# Altium PCB PCB1.PcbDoc (part 1 of 2)
Units mm, origin at the board's own origin, x right, y up, seen from the top; angles counter-clockwise.
Board outline 90 x 58.77 mm, 6 copper layers (L1, GND1, +3V3, 1.8V, GND, L6), stack 1.776 mm thick; 134 components, 89 nets, 660 pads, 134 vias.
Unrouted connection lines stored in the file: 40.
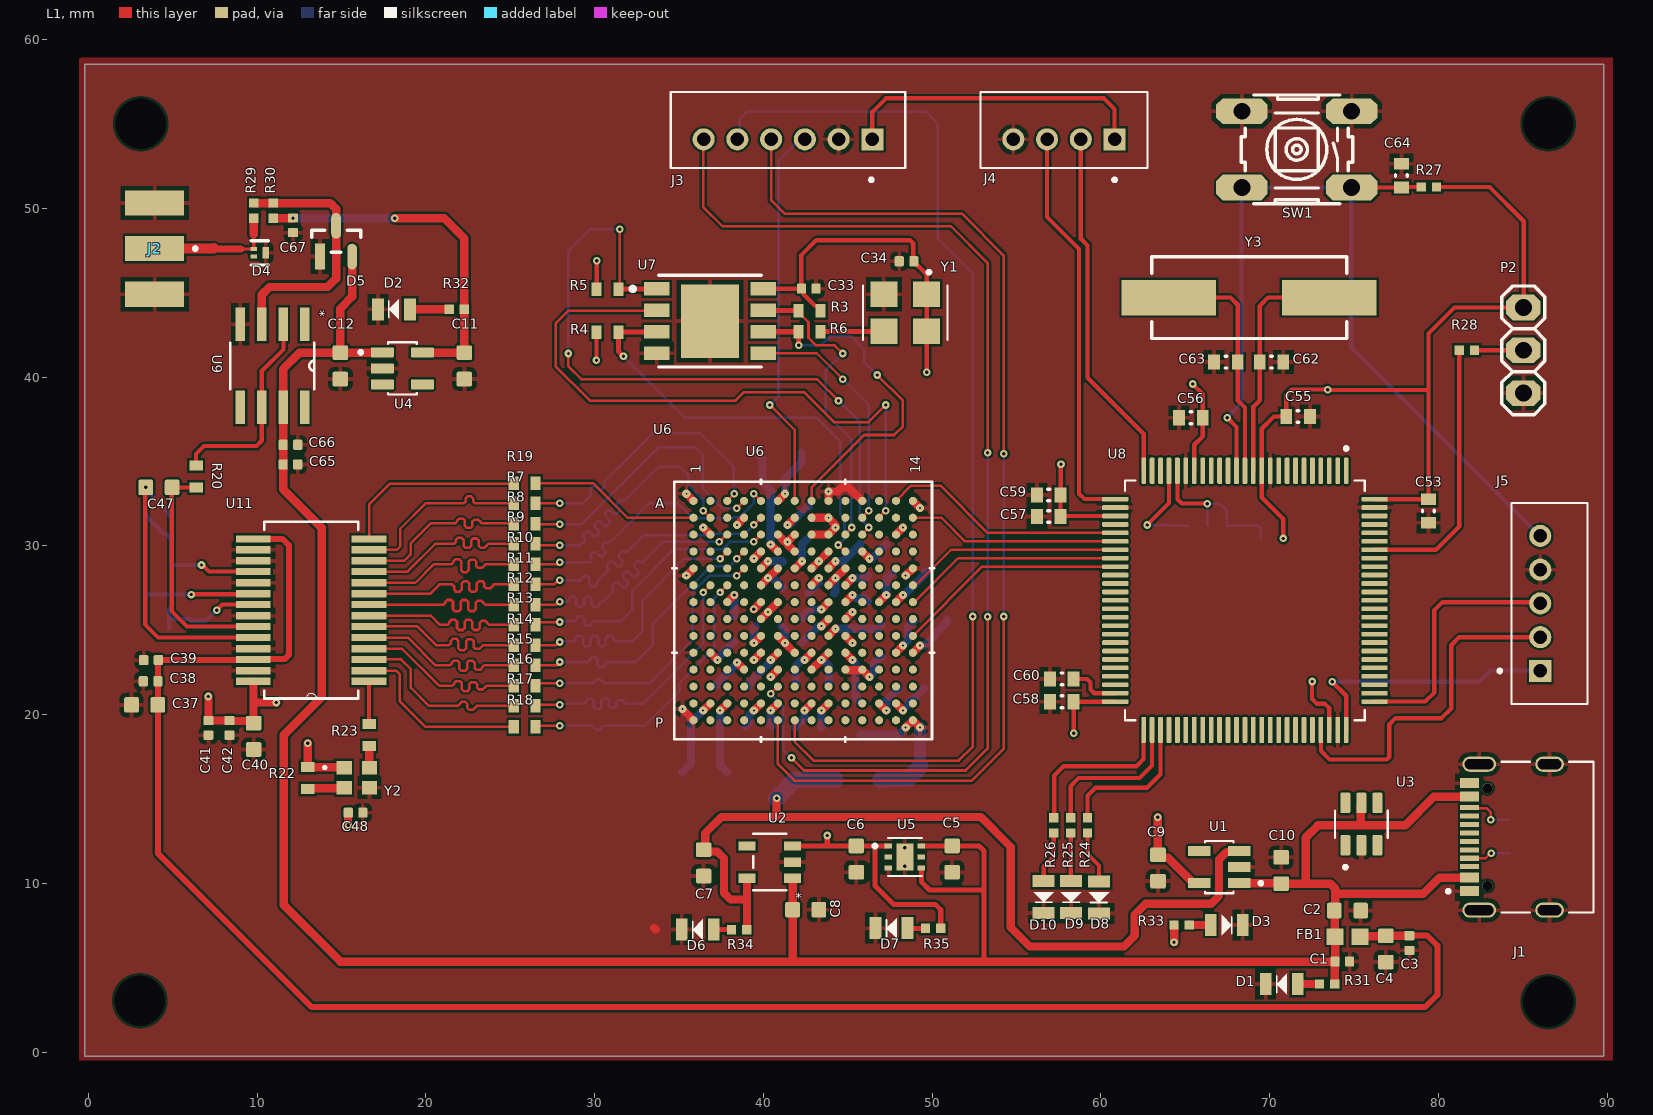
[diagram p0: L1 view]
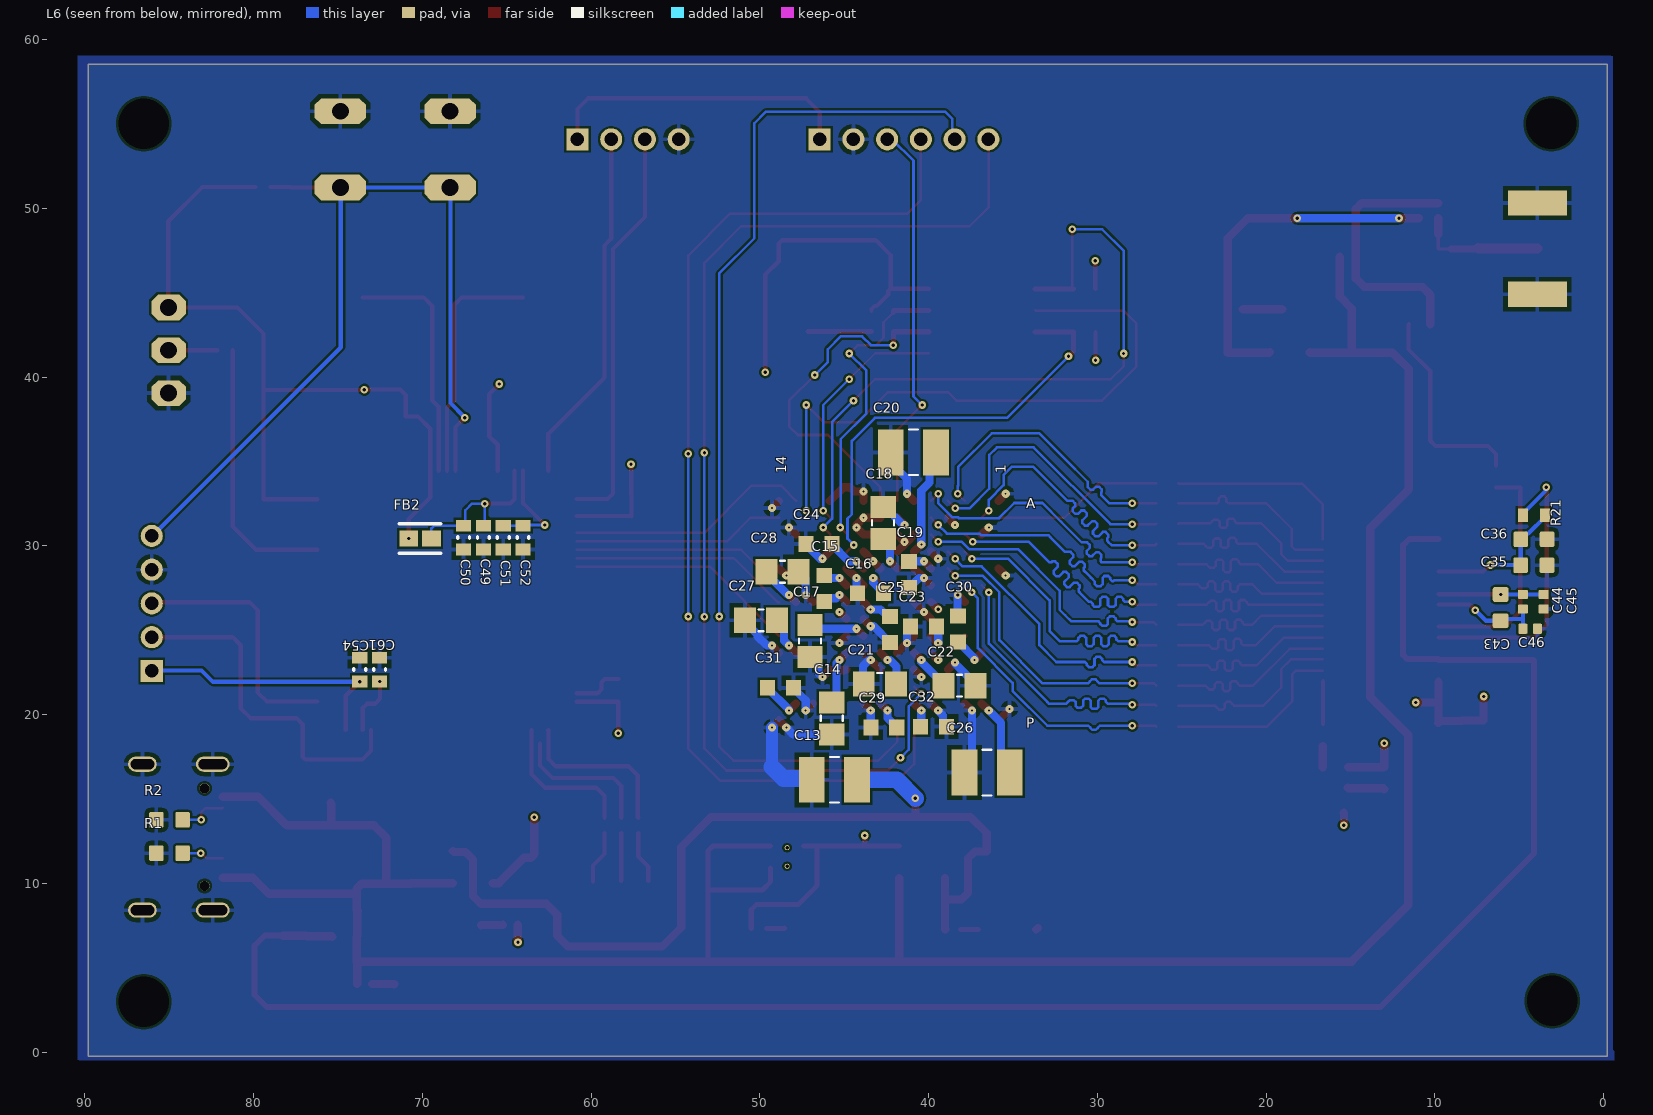
[diagram p1: L6 view, seen from below]
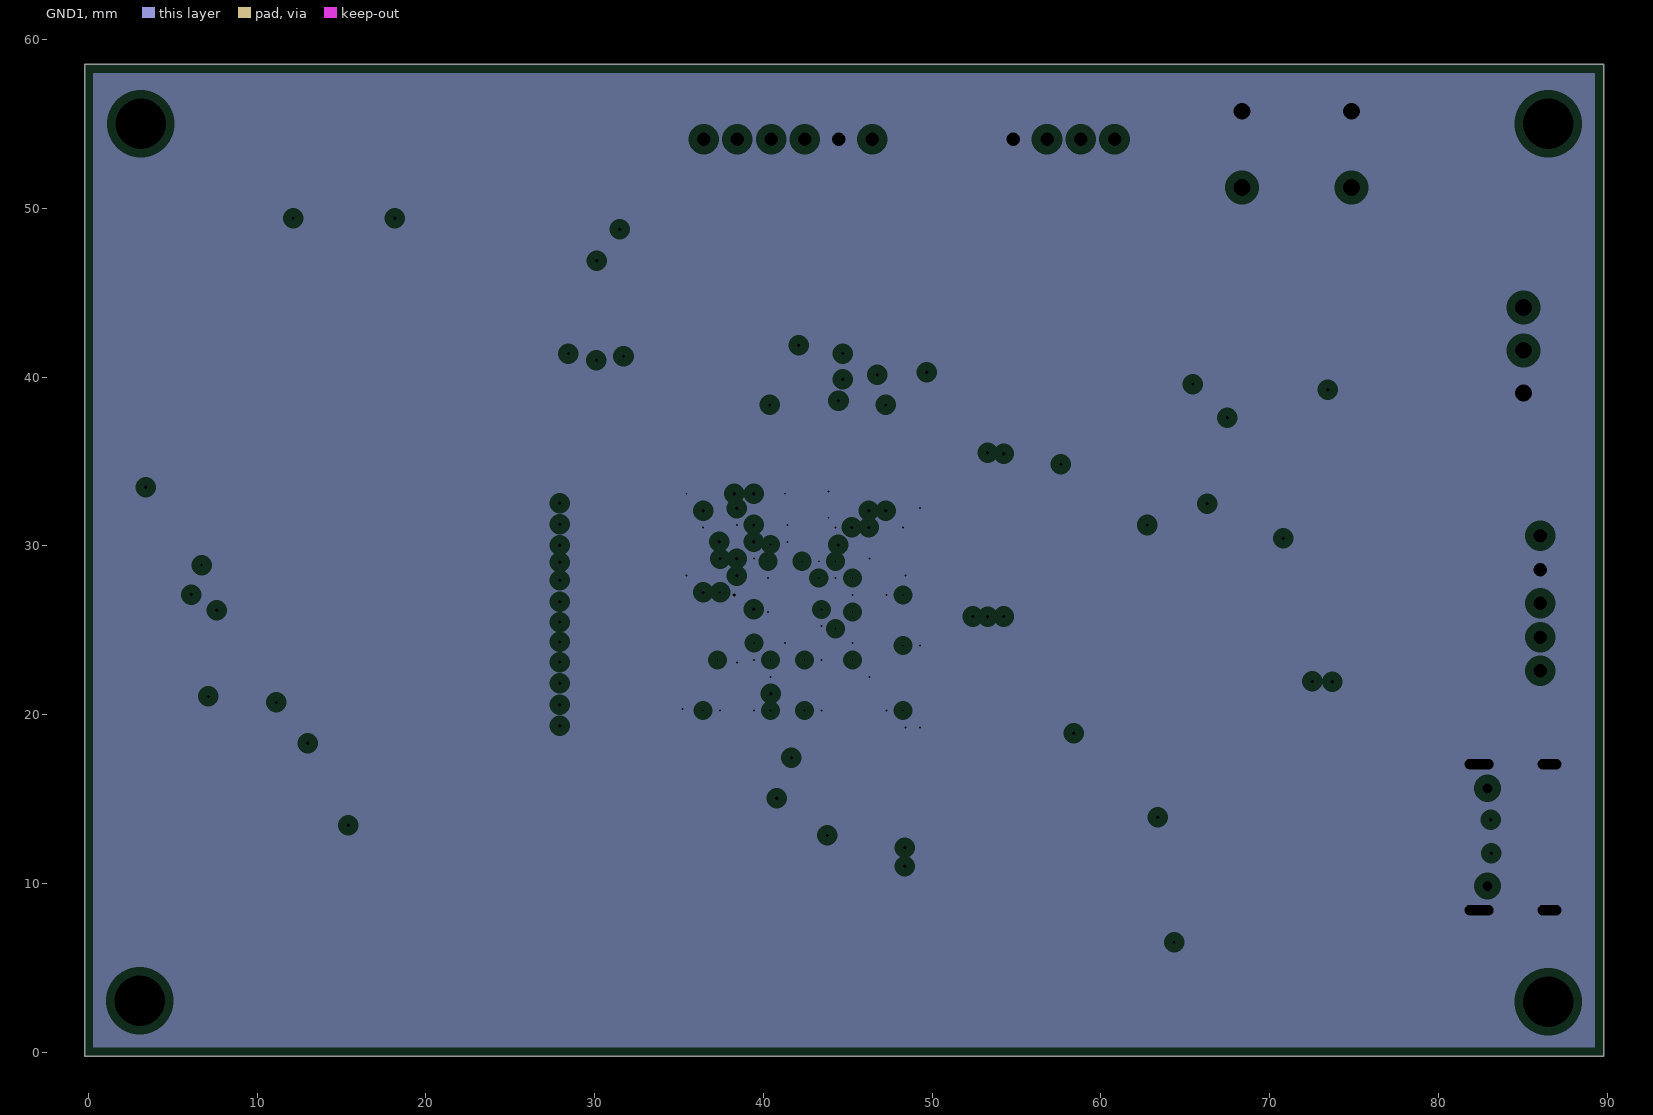
[diagram p2: GND1, clearances drawn from the general rule]
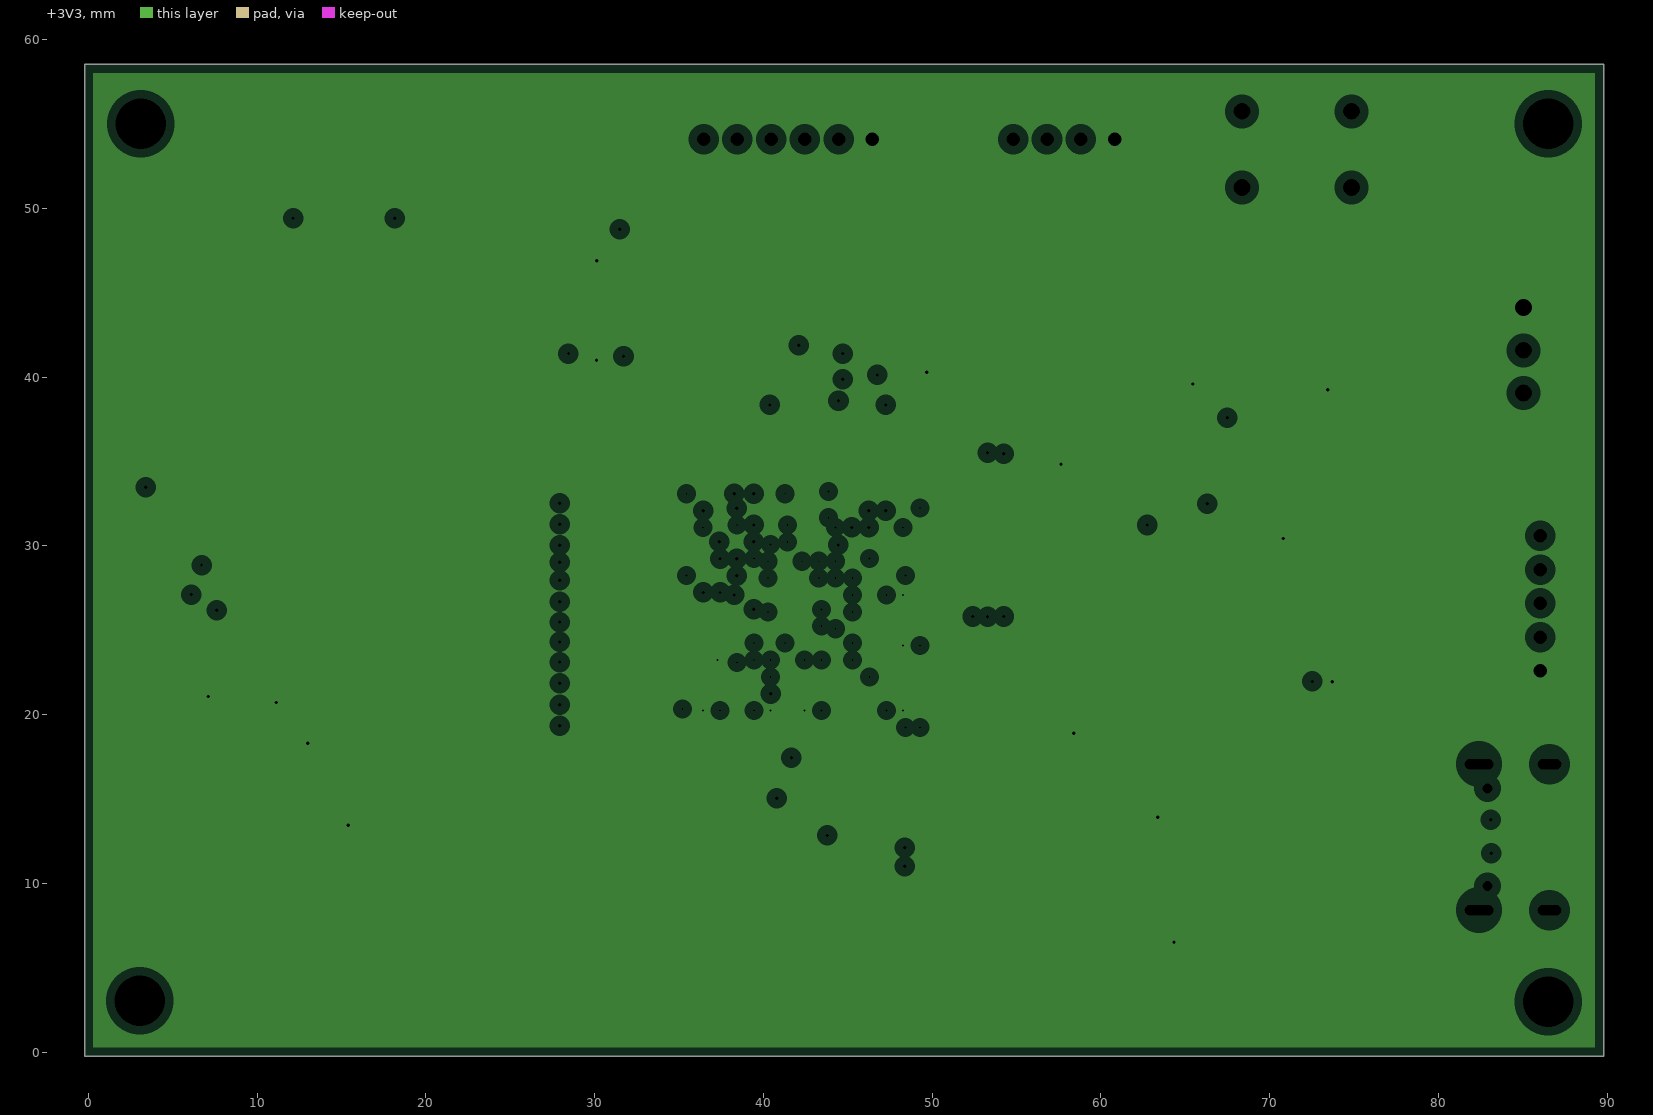
[diagram p3: +3V3, clearances drawn from the general rule]
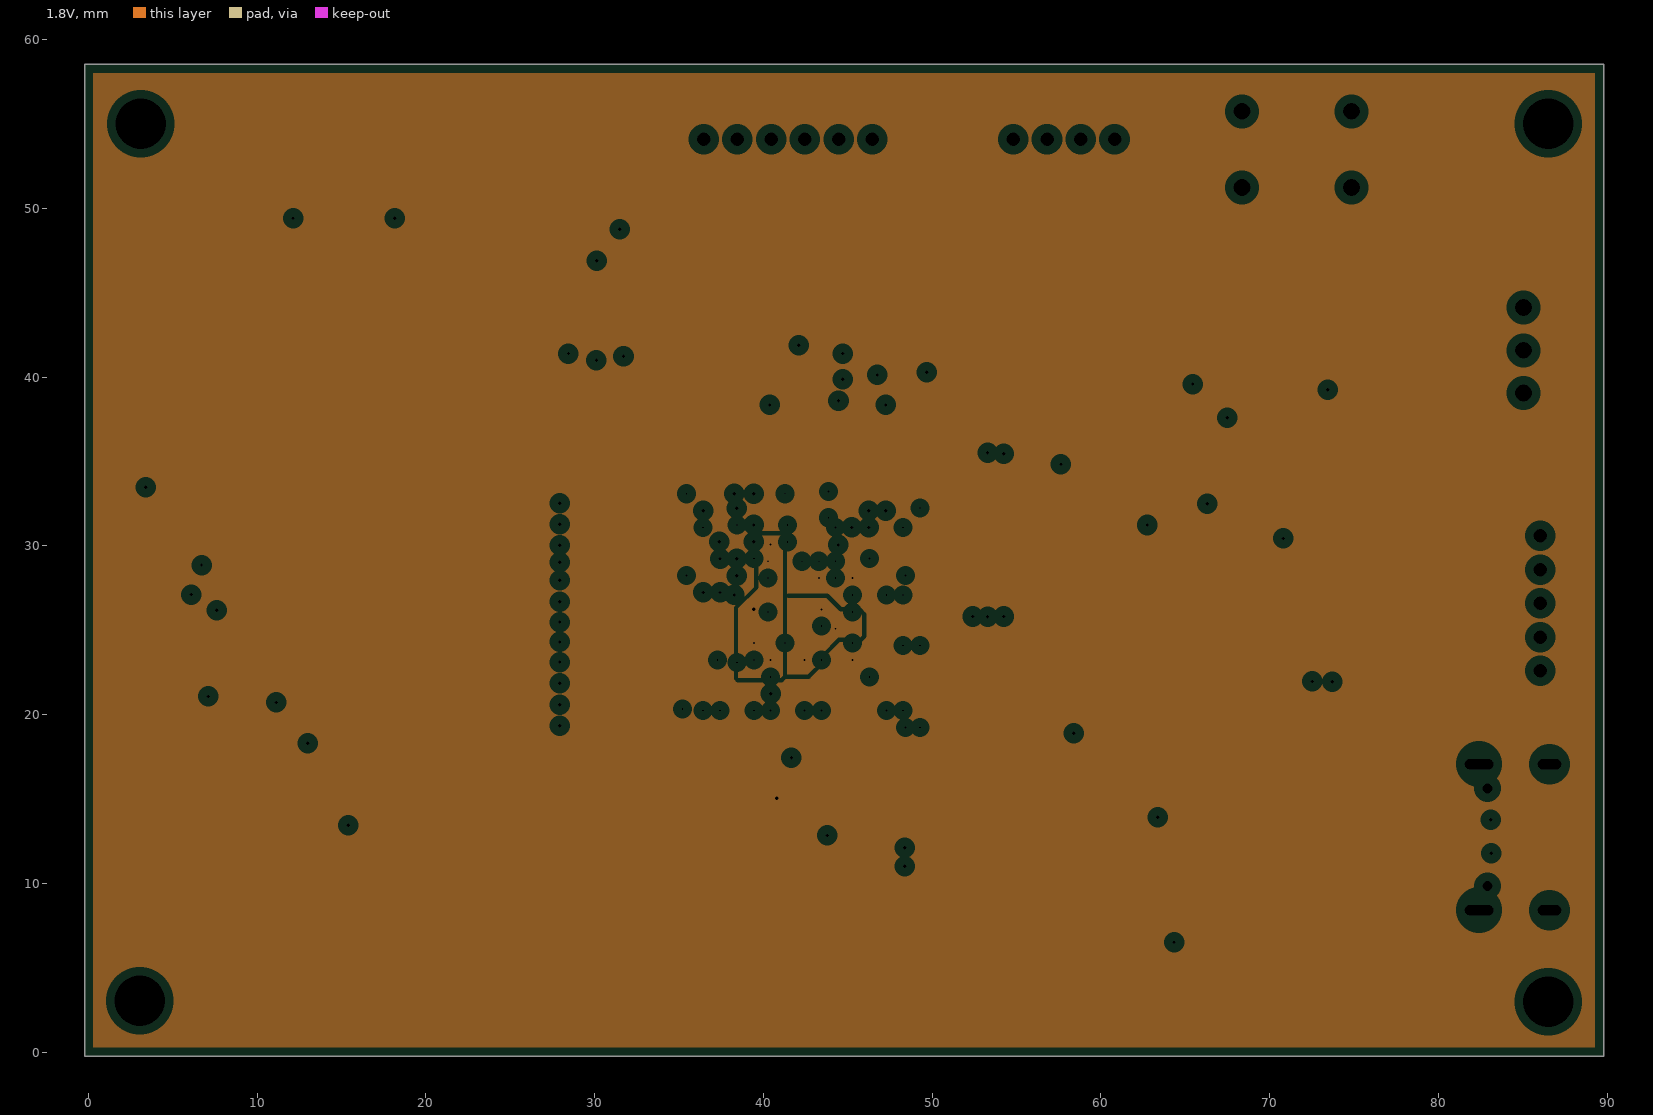
[diagram p4: 1.8V, clearances drawn from the general rule]
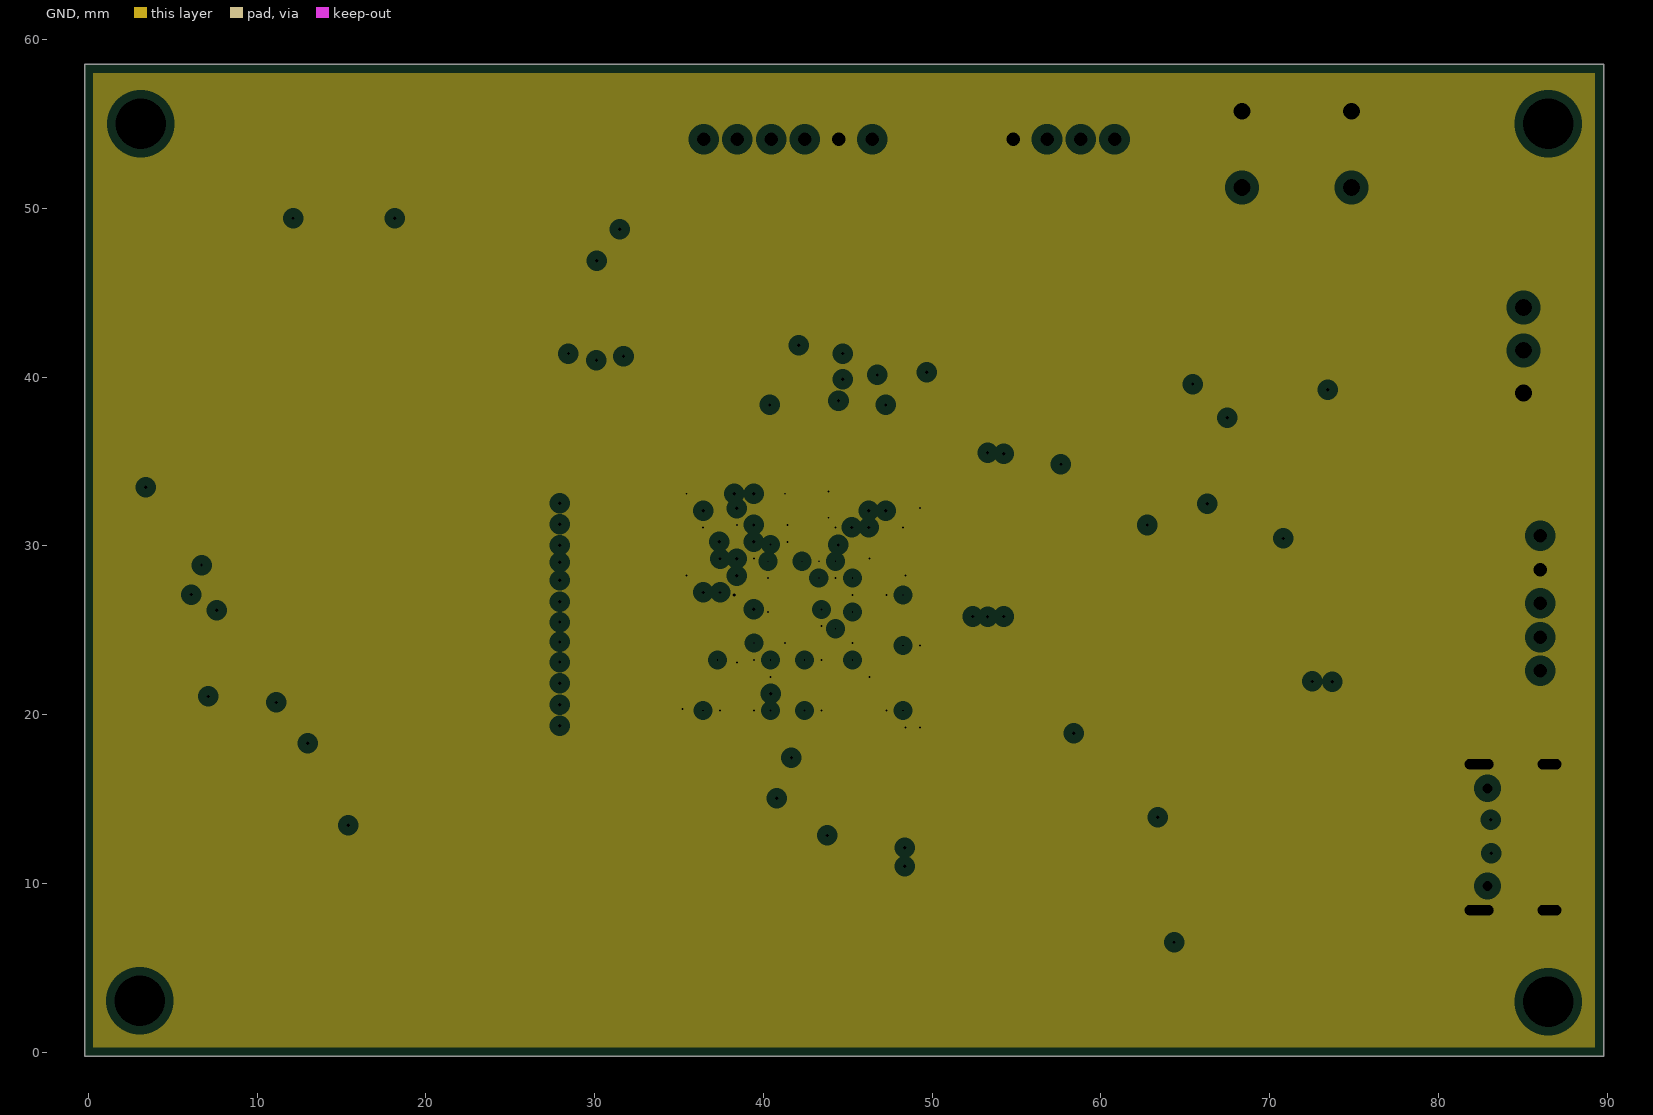
[diagram p5: GND, clearances drawn from the general rule]
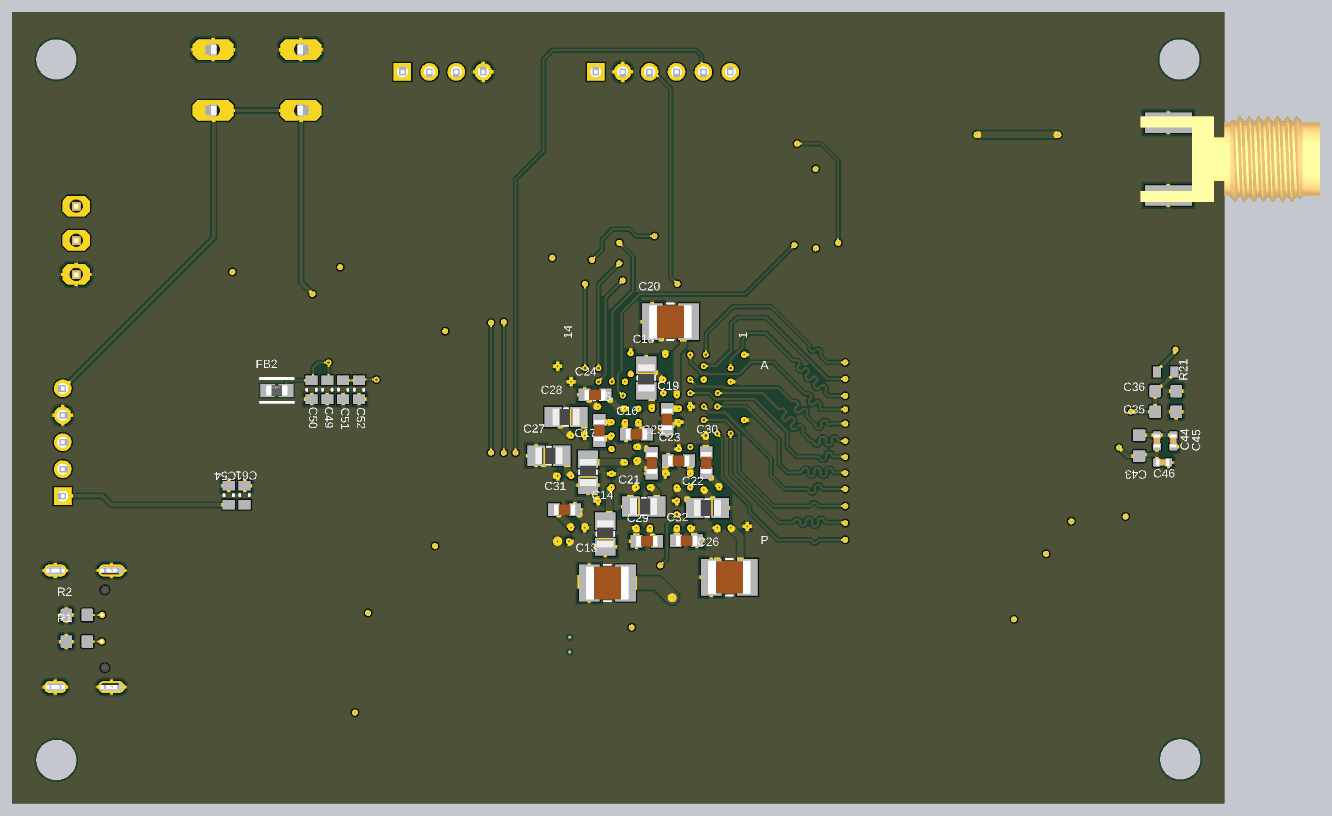
[diagram p7: 3D render of the assembled board from below, using the file's embedded part models]

## Layer stack, top to bottom
Top Solder: solder mask 0.0102, Solder Resist, Dk 3.5
L1: signal copper 0.035
Dielectric 4: prepreg 0.0711, PP-006, Dk 4.1
GND1: plane copper 0.035, net GND
Dielectric 2: prepreg 0.0994, PP-006, Dk 4.1
+3V3: plane copper 0.0152, net +3V3
Dielectric 1: dielectric 1.265, FR-4, Dk 4.8
1.8V: plane copper 0.0152, net (Multiple Nets)
Dielectric 3: prepreg 0.0994, PP-006, Dk 4.1
GND: plane copper 0.035, net GND
Dielectric 5: prepreg 0.0711, PP-006, Dk 4.1
L6: signal copper 0.035
Bottom Solder: solder mask 0.0102, Solder Resist, Dk 3.5

## Board outline
-0.218,-0.229 89.782,-0.229 89.782,58.546 -0.218,58.546

## Design rules (kind name [scope] priority, off if disabled: settings)
Clearance [All] p1: gap=0.127 ignorepadtopadclearanceinfootprint=TRUE
DiffPairsRouting [IsDifferentialPair] p1: maxlimit=0.127 minlimit=0.127 mostfreqgap=0.127 toplayer_minwidth=0.149 toplayer_maxwidth=0.149 toplayer_prefwidth=0.111 bottomlayer_minwidth=0.149 bottomlayer_maxwidth=0.149 bottomlayer_prefwidth=0.111 impedanceprofiledriven=TRUE impedanceprofileid={DFE40310-2069-4B15-A589-D58F6F8A00B4} impedanceprofilevalue=90.000000 maxuncoupledlength=12.7
HoleSize [All] p1: absolutevalues=TRUE maxlimit=3.5 minlimit=0.025 maxpercent=80.000 minpercent=20.000
MatchedLengths ADC_LENGTHMATCH [InNetClass('adc')] p1: tolerance=25.4 checknetsindiffpair=FALSE checkdiffpairvsdiffpair=TRUE checkxsignals=TRUE checkothers=TRUE usedelayunits=TRUE delaytolerance=5.000000
MinimumSolderMaskSliver [All] p1: minsoldermaskwidth=0
PlaneClearance [All] p1: clearance=0.508
PlaneConnect [All] p1: pad.planeconnectstyle=Direct pad.reliefexpansion=0.508 pad.reliefentries=4 pad.reliefconductorwidth=0.254 pad.reliefairgap=0.254 via.planeconnectstyle=Relief via.reliefexpansion=0.508 via.reliefentries=4 via.reliefconductorwidth=0.254 via.reliefairgap=0.254
PolygonConnect [All] p1: connectstyle=Relief reliefconductorwidth=0.254 reliefentries=4 polygonreliefangle="90 Angle" airgapwidth=0.254
RoutingVias [All] p1: holewidth=0.2 width=0.45 viastyle="Through Hole" minholewidth=0.2 minwidth=0.45 maxholewidth=6.3 maxwidth=1.27
SilkToSilkClearance [All] p1: silktosilkclearance=0.1
SilkToSolderMaskClearance [IsPad] p1: minsilkscreentomaskgap=0 clearancetoexposedcopper=TRUE
SolderMaskExpansion [IsVia] p1: expansion=0.051 istentingtop=FALSE
SolderMaskExpansion SolderMaskExpansion_1 [All] p2: expansion=0.102 istentingtop=FALSE
SupplyNets "Schematic Supply Nets_8" [InNet('+3V3')] p1: voltage=0.000
SupplyNets "Schematic Supply Nets_7" [InNet('+5V_ANALOG')] p2: voltage=0.000
SupplyNets "Schematic Supply Nets" [InNet('GND')] p3: voltage=0.000
SupplyNets "Schematic Supply Nets_6" [InNet('+1V8')] p4: voltage=0.000
SupplyNets "Schematic Supply Nets_5" [InNet('+1V0')] p5: voltage=0.000
SupplyNets "Schematic Supply Nets_2" [InNet('+3V3_OFFSET')] p6: voltage=0.000
SupplyNets "Schematic Supply Nets_1" [InNet('+5V_USB')] p7: voltage=0.000
Width [All] p1: maxlimit=10 minlimit=0.15 preferedwidth=0.254 minimp=50.000000 maximp=50.000000 favimp=50.000000
23 further rules are at their usual default settings.

## Classes and differential pairs
differential pair class "New Class": MCU_D USB_D
net class "New Class": MCU_D_N MCU_D_P USB_D_N USB_D_P
net class bit: bit1 bit2 bit3 bit4 bit5 bit6 bit7 bit8 bit9 bit10 bit11 bit12
net class adc: ADC_D0 ADC_D1 ADC_D2 ADC_D3 ADC_D4 ADC_D5 ADC_D6 ADC_D7 ADC_D8 ADC_D9 ADC_D10 ADC_D11
component class Sheet6: C65 C66 C67 D4 D5 J2 R29 R30 U9 U10
component class Sheet5: C49 C50 C51 C52 C53 C54 C55 C56 C57 C58 C59 C60 C61 C62 C63 C64 D8 D9 D10 FB2 J4 J5 P2 R24 R25 R26 R27 R28 SW1 U8 Y3
component class Sheet4: C35 C36 C37 C38 C39 C40 C41 C42 C43 C44 C45 C46 C47 C48 R7 R8 R9 R10 R11 R12 R13 R14 R15 R16 R17 R18 R19 R20 R21 R22 R23 U6 U11 Y2
component class Sheet3: C33 C34 J3 R3 R4 R5 R6 U7 Y1
component class Sheet2: C13 C14 C15 C16 C17 C18 C19 C20 C21 C22 C23 C24 C25 C26 C27 C28 C29 C30 C31 C32
component class Sheet1: C1 C2 C3 C4 C5 C6 C7 C8 C9 C10 C11 C12 D1 D2 D3 D6 D7 FB1 J1 R1 R2 R31 R32 R33 R34 R35 U1 U2 U3 U4 U5
differential pair MCU_D: +MCU_D_P -MCU_D_N
differential pair USB_D: +USB_D_P -USB_D_N

## Components (designator, comment, footprint, x,y, rotation, side; value= is the part's Value field where it differs from the comment)
C1 "0402YC104MAT2A" 0402 74.307,5.371 r180 top
C2 "GRM21BZ71E106KE15L" 0603 74.607,8.396 r180 top
C3 "0402YC104MAT2A" 0402 78.282,6.471 r90 top
C4 "GRM21BZ71E106KE15L" 0603 76.882,6.121 r90 top
C5 "CAP_CER_0603" 0603 51.182,11.446 r90 top
C6 "CAP_CER_0603" 0603 45.507,11.446 r90 top
C7 "CAP_CER_0603" 0603 36.457,11.221 r90 top
C8 "CAP_CER_0603" 0603 42.507,8.446 r180 top
C9 "CAP_CER_0603" 0603 63.382,10.921 r90 top
C10 "CAP_CER_0603" 0603 70.682,10.771 r270 top
C11 "CAP_CER_0603" 0603 22.282,40.671 r90 top
C12 "CAP_CER_0603" 0603 14.932,40.671 r90 top
C13 "47uF" GRM32ER70J476ME20L 45.582,16.146 r180 bottom
C14 "4.7uF" GRM21BR71A475KA73K 45.741,19.787 r90 bottom
C15 "0.47uF" GRM188R70J474KA01D 46.182,27.471 r90 bottom
C16 "0.47uF" GRM188R70J474KA01D 43.432,27.196 r180 bottom
C17 "4.7uF" GRM21BR71A475KA73K 47.028,24.367 r90 bottom
C18 "4.7uF" GRM21BR71A475KA73K 42.696,31.372 r270 bottom
C19 "0.47uF" GRM188R70J474KA01D 41.157,28.296 r90 bottom
C20 "100uF" GRM32ER60J107ME20L 40.907,35.546 r180 bottom
C21 "4.7uF" GRM21BR71A475KA73K 42.892,21.821 r180 bottom
C22 "4.7uF" GRM21BR71A475KA73K 38.17,21.721 r0 bottom
C23 "0.47uF" GRM188R70J474KA01D 40.302,25.229 r180 bottom
C24 "0.47uF" GRM188R70J474KA01D 46.504,30.111 r180 bottom
C25 "0.47uF" GRM188R70J474KA01D 42.282,25.046 r90 bottom
C26 "47uF" GRM32ER70J476ME20L 36.532,16.571 r180 bottom
C27 "4.7uF" GRM21BR71A475KA73K 49.932,25.596 r180 bottom
C28 "4.7uF" GRM21BR71A475KA73K 48.657,28.471 r0 bottom
C29 "0.47uF" GRM188R70J474KA01D 42.657,19.246 r180 bottom
C30 "0.47uF" GRM188R70J474KA01D 38.257,25.071 r270 bottom
C31 "0.47uF" GRM188R70J474KA01D 48.768,21.59 r0 bottom
C32 "0.47uF" GRM188R70J474KA01D 39.707,19.296 r0 bottom
C33 "CC0402JRX7R7BB104" 0402 42.682,45.246 r180 top
C34 "CC0402JRX7R7BB104" 0402 48.482,46.871 r0 top
C35 "CAP_CER_0603" 0603 4.138,28.859 r0 bottom
C36 "CAP_CER_0603" 0603 4.132,30.396 r0 bottom
C37 "CAP_CER_0603" 0603 3.338,20.584 r0 top
C38 "CC0402JRX7R7BB104" 0402 3.688,21.984 r0 top
C39 "CC0402JRX7R7BB104" 0402 3.713,23.234 r0 top
C40 "CAP_CER_0603" 0603 9.799,18.721 r90 top
C41 "CC0402JRX7R7BB104" 0402 7.112,19.219 r90 top
C42 "CC0402JRX7R7BB104" 0402 8.362,19.219 r90 top
C43 "CAP_CER_0603" 0603 6.107,26.346 r90 bottom
C44 "CC0402JRX7R7BB104" 0402 4.782,26.696 r90 bottom
C45 "CC0402JRX7R7BB104" 0402 3.557,26.696 r90 bottom
C46 "CC0402JRX7R7BB104" 0402 4.357,25.096 r0 bottom
C47 "CAP_CER_0603" 0603 4.182,33.471 r0 top
C48 "CC0402JRX7R7BB104" 0402 15.832,14.196 r180 top
C49 "100nF" CAPC0603(1608)100_L 66.382,30.496 r270 bottom value=2.7nF
C50 "100nF" CAPC0603(1608)100_L 67.557,30.496 r270 bottom value=2.7nF
C51 "100nF" CAPC0603(1608)100_L 65.207,30.496 r270 bottom value=2.7nF
C52 "100nF" CAPC0603(1608)100_L 64.032,30.496 r270 bottom value=2.7nF
C53 "100nF" CAPC0603(1608)100_L 79.407,32.071 r270 top value=2.7nF
C54 "100nF" CAPC0603(1608)100_L 73.707,22.671 r90 bottom value=2.7nF
C55 "100nF" CAPC0603(1608)100_L 71.682,37.671 r0 top value=2.7nF
C56 "100nF" CAPC0603(1608)100_L 65.332,37.596 r180 top value=2.7nF
C57 "100nF" CAPC0603(1608)100_L 56.907,31.746 r180 top value=2.7nF
C58 "100nF" CAPC0603(1608)100_L 57.682,20.771 r180 top value=2.7nF
C59 "4.7uF" CAPC0603(1608)100_L 56.907,33.021 r180 top value=2.7nF
C60 "100nF" CAPC0603(1608)100_L 57.682,22.121 r180 top value=2.7nF
C61 "100nF" CAPC0603(1608)100_L 72.532,22.671 r90 bottom value=2.7nF
C62 "26uF" CAPC0603(1608)100_L 70.107,40.896 r180 top value=2.7nF
C63 "26uF" CAPC0603(1608)100_L 67.407,40.896 r0 top value=2.7nF
C64 "0.1uF" CAPC0603(1608)100_L 77.807,51.946 r90 top value=2.7nF
C65 "CC0402JRX7R7BB104" 0402 11.975,34.832 r180 top
C66 "CC0402JRX7R7BB104" 0402 11.975,35.996 r180 top
C67 "CC0402JRX7R7BB104" 0402 12.132,48.996 r90 top
D1 "LTST-C171GKT" LED_GREEN_0805 70.712,4.041 r0 top
D2 "LTST-C171GKT" LED_GREEN_0805 18.107,44.021 r0 top
D3 "LTST-C171GKT" LED_GREEN_0805 67.455,7.539 r180 top
D4 "PESD5V0V2BMYL" FP-SOT883-MFG 10.157,47.371 r0 top
D5 "BAV99LT1G" FP-318-08-IPC_B 14.682,48.056 r90 top
D6 "LTST-C171GKT" LED_GREEN_0805 36.107,7.271 r0 top
D7 "LTST-C171GKT" LED_GREEN_0805 47.591,7.352 r0 top
D8 "LH R974-LP-1" LED_RED_0805 59.882,9.171 r90 top
D9 "LH R974-LP-1" LED_RED_0805 58.232,9.196 r90 top
D10 "LH R974-LP-1" LED_RED_0805 56.607,9.196 r90 top
FB1 "BLM18PG121SN1D" 0603_FB 74.607,6.846 r0 top
FB2 "BLM18PG600SN1D" FP-BLM18-0_15-t0_8-IPC_B 70.132,30.446 r0 bottom
J1 "TYPE-C-31-M-12" HRO_TYPE-C-31-M-12 86.582,12.746 r90 top
J2 "SMA_180_EDGEMOUNT" SMA 3.932,47.621 r0 top
J3 "B6B-PH-K-S" JST_B6B-PH-K-S 41.457,54.646 r0 top
J4 "B4B-PH-K-S(LF)(SN)" JST_B4B-PH-K-S(LF)(SN) 57.807,54.646 r0 top
J5 "B5B-PH-K-S(LF)(SN)" JST_B5B-PH-K-S(LF)(SN) 86.582,26.596 r270 top
P2 "Header 3" My_1X03 85.032,41.596 r270 top
R1 "5.1k" 0603 84.982,11.796 r180 bottom
R2 "5.1k" 0603 84.982,13.771 r180 bottom
R3 "4.7K" RESC1608X55X25LL10T15 42.732,43.946 r0 top
R4 "4.7K" RESC1608X55X25LL10T15 30.757,42.671 r180 top
R5 "4.7K" RESC1608X55X25LL10T15 30.757,45.221 r180 top
R6 "22R" RESC1608X55X25LL10T15 42.732,42.696 r0 top
R7 "22R" RESC1608X55X25LL10T15 25.857,32.521 r180 top
R8 "22R" RESC1608X55X25LL10T15 25.857,31.321 r180 top
R9 "22R" RESC1608X55X25LL10T15 25.857,30.121 r180 top
R10 "22R" RESC1608X55X25LL10T15 25.857,28.921 r180 top
R11 "22R" RESC1608X55X25LL10T15 25.857,27.721 r180 top
R12 "22R" RESC1608X55X25LL10T15 25.857,26.521 r180 top
R13 "22R" RESC1608X55X25LL10T15 25.857,25.321 r180 top
R14 "22R" RESC1608X55X25LL10T15 25.857,24.121 r180 top
R15 "22R" RESC1608X55X25LL10T15 25.857,22.921 r180 top
R16 "22R" RESC1608X55X25LL10T15 25.857,21.721 r180 top
R17 "22R" RESC1608X55X25LL10T15 25.857,20.521 r180 top
R18 "22R" RESC1608X55X25LL10T15 25.857,19.296 r180 top
R19 "22R" RESC1608X55X25LL10T15 25.857,33.721 r0 top
R20 "33R" RESC1608X55X25LL10T15 6.382,34.121 r90 top
R21 "33R" RESC1608X55X25LL10T15 4.132,31.821 r0 bottom
R22 "10K" RESC1608X55X25LL10T15 13.007,16.246 r270 top
R23 "22R" RESC1608X55X25LL10T15 16.632,18.796 r270 top
R24 "3k3" RESC1005X40X20NL05T10 59.209,13.441 r270 top
R25 "3k3" RESC1005X40X20NL05T10 58.209,13.441 r270 top
R26 "3k3" RESC1005X40X20NL05T10 57.209,13.441 r270 top
R27 "10k" RESC1005X40X20NL05T10 79.432,51.271 r180 top
R28 "10k" RESC1005X40X20NL05T10 81.682,41.596 r0 top
R29 "16K" RESC1005X40X20NL05T10 9.807,49.871 r270 top
R30 "10K" RESC1005X40X20NL05T10 10.949,49.869 r270 top
R31 "3k3" RESC1005X40X20NL05T10 73.407,4.046 r0 top
R32 "3k3" RESC1005X40X20NL05T10 21.832,44.021 r0 top
R33 "3k3" RESC1005X40X20NL05T10 64.782,7.546 r180 top
R34 "3k3" RESC1005X40X20NL05T10 38.557,7.265 r0 top
R35 "3k3" RESC1005X40X20NL05T10 50.057,7.346 r0 top
SW1 "Tac switch" MY_TACTILE-PTH 71.607,53.496 r180 top (schematic designator sw1)
U1 "AP2112K-3.3TRG1" SOT-25 67.007,10.971 r180 top
U2 "AP2112K-1.8TRG1 (2)" AP2112K-1.8TRG1_DIO 40.382,11.271 r180 top
U3 "USBLC6-2SC6" SOT95P280X145-6N 75.432,13.521 r90 top
U4 "AP2112K-3.3TRG1" SOT-25 18.607,40.521 r0 top
U5 "TLV75710PDRVR" WSON-6 48.382,11.571 r0 top
U6 "XC7S25-1FTGB196C" FTGB196SPARTAN-7_AMD 42.484,26.044 r0 top
U7 "W25Q64JVZPIQ" FP-ZP-MFG 36.832,43.326 r0 top
U8 "STM32F407VGT6-2" LQFP100 68.532,26.776 r270 top
U9 "AD8065ARZ-REEL7" SOIC-8 10.907,40.671 r270 top
U11 "AD9226ARSZRL-2" SSOP-28 13.207,26.196 r180 top
Y1 "SG5032CAN-2" SG5032CAN 48.407,43.821 r270 top
Y2 "SIT1602BC-72-XXN-65.000000G" SON4_SIT1602-7_SIT 15.782,16.146 r0 top
Y3 "ABLS-8.000MHZ-B2-T" FP-ABLS-MFG 68.782,44.721 r0 top

## Footprints (in the part's own frame and the unit in brackets; to place one, negate y for a bottom-side part, rotate by r counter-clockwise, add the part's x,y. Pads: shape width x height; smd on the part's side, far side on the other; paste and mask are expansions set on the pad)
0402 [mm]
  rrect25% 0.54x0.6 smd paste+0 mask+0.102: 1(-0.432,0) 2(0.432,0)
  body extent -0.5,-0.25 0.5,0.25, height 0.55
0603 [mm]
  rrect25% 0.87x0.93 smd paste+0 mask+0.102: 1(-0.78,0) 2(0.78,0)
0603_FB [mm]
  rect 1x0.97 smd: 1(-0.735,0) 2(0.735,0)
AP2112K-1.8TRG1_DIO [mil]
  rect 39.56x22 smd paste+0 mask+0: 1(-53.28,37.4) 2(-53.28,0) 3(-53.28,-37.4) 4(53.28,-37.4) 5(53.28,37.4)
  silkscreen extent -39,-66 39,66, body extent -59,-61 59,61, height 45
CAPC0603(1608)100_L [mm] "Chip Capacitor, Body 1.6x0.8mm, Height 1.0mm, IPC High Density"
  rect 0.7x0.9 smd: 1(-0.7,0) 2(0.7,0)
  silkscreen extent -0.05,-0.35 0.05,0.35, body extent -0.87,-0.47 0.88,0.48, height 1
FP-318-08-IPC_B [mm]
  rect 1.524x0.578 smd paste+0 mask+0: 1(-0.91,0.95)
  rrect100% 1.524x0.578 smd paste+0 mask+0: 2(-0.91,-0.95) 3(0.91,0)
  silkscreen extent -0.65,-1.45 0.65,1.45, body extent -1.92,-1.7 1.92,1.7, height 0.25
FP-ABLS-MFG [mm]
  rect 5.6x2.1 smd paste+0 mask+0: 1(-4.75,0) 2(4.75,0)
  silkscreen extent -5.77,-2.42 5.77,2.42, body extent -7.65,-2.52 7.65,2.52, height 0.25
FP-BLM18-0_15-t0_8-IPC_B [mm]
  rect 1.106x0.958 smd paste+0 mask+0: 1(-0.676,0) 2(0.676,0)
  silkscreen extent -1.23,-0.88 1.23,0.88, body extent -0.8,-0.4 0.8,0.4, height 0.95
FP-SOT883-MFG [mm]
  rrect40% 0.4x0.25 smd paste-1000 mask+0: 1(-0.35,0.225) 2(-0.35,-0.225)
  rrect25% 0.4x0.7 smd paste-1000 mask+0: 3(0.35,0)
  silkscreen extent -0.51,-0.72 0.51,0.72, body extent -0.65,-0.45 0.65,0.45, height 0.25
FP-ZP-MFG [mm]
  rect 1.5x0.8 smd paste-1000 mask+0: 1(-3.15,1.905) 2(-3.15,0.635) 3(-3.15,-0.635) 4(-3.15,-1.905) 5(3.15,-1.905) 6(3.15,-0.635) 7(3.15,0.635) 8(3.15,1.905)
  rect 3.45x4.35 smd paste+0 mask+0: 9(0,0)
  silkscreen extent -4.7,-2.73 3.05,2.73, body extent -4,-2.65 4,2.65, height 0.25
FTGB196SPARTAN-7_AMD [mil]
  round 19 smd paste+0 mask+0: A1(-260.91,260.91) A2(-221.54,260.91) A3(-182.17,260.91) A4(-142.8,260.91) A5(-103.43,260.91) A6(-64.06,260.91) A7(-24.69,260.91) A8(14.68,260.91) A9(54.06,260.91) A10(93.43,260.91) A11(132.8,260.91) A12(172.17,260.91) A13(211.54,260.91) A14(250.91,260.91) B1(-260.91,221.54) B2(-221.54,221.54) B3(-182.17,221.54) B4(-142.8,221.54) B5(-103.43,221.54) B6(-64.06,221.54) B7(-24.69,221.54) B8(14.68,221.54) B9(54.06,221.54) B10(93.43,221.54) B11(132.8,221.54) B12(172.17,221.54) B13(211.54,221.54) B14(250.91,221.54) C1(-260.91,182.17) C2(-221.54,182.17) C3(-182.17,182.17) C4(-142.8,182.17) C5(-103.43,182.17) C6(-64.06,182.17) C7(-24.69,182.17) C8(14.68,182.17) C9(54.06,182.17) C10(93.43,182.17) C11(132.8,182.17) C12(172.17,182.17) C13(211.54,182.17) C14(250.91,182.17) D1(-260.91,142.8) D2(-221.54,142.8) D3(-182.17,142.8) D4(-142.8,142.8) D5(-103.43,142.8) D6(-64.06,142.8) D7(-24.69,142.8) D8(14.68,142.8) D9(54.06,142.8) D10(93.43,142.8) D11(132.8,142.8) D12(172.17,142.8) D13(211.54,142.8) D14(250.91,142.8) E1(-260.91,103.43) E2(-221.54,103.43) E3(-182.17,103.43) E4(-142.8,103.43) E5(-103.43,103.43) E6(-64.06,103.43) E7(-24.69,103.43) E8(14.68,103.43) E9(54.06,103.43) E10(93.43,103.43) E11(132.8,103.43) E12(172.17,103.43) E13(211.54,103.43) E14(250.91,103.43) F1(-260.91,64.06) F2(-221.54,64.06) F3(-182.17,64.06) F4(-142.8,64.06) F5(-103.43,64.06) F6(-64.06,64.06) F7(-24.69,64.06) F8(14.68,64.06) F9(54.06,64.06) F10(93.43,64.06) F11(132.8,64.06) F12(172.17,64.06) F13(211.54,64.06) F14(250.91,64.06) G1(-260.91,24.69) G2(-221.54,24.69) G3(-182.17,24.69) G4(-142.8,24.69) G5(-103.43,24.69) G6(-64.06,24.69) G7(-24.69,24.69) G8(14.68,24.69) G9(54.06,24.69) G10(93.43,24.69) G11(132.8,24.69) G12(172.17,24.69) G13(211.54,24.69) G14(250.91,24.69) H1(-260.91,-14.68) H2(-221.54,-14.68) H3(-182.17,-14.68) H4(-142.8,-14.68) H5(-103.43,-14.68) H6(-64.06,-14.68) H7(-24.69,-14.68) H8(14.68,-14.68) H9(54.06,-14.68) H10(93.43,-14.68) H11(132.8,-14.68) H12(172.17,-14.68) H13(211.54,-14.68) H14(250.91,-14.68) J1(-260.91,-54.06) J2(-221.54,-54.06) J3(-182.17,-54.06) J4(-142.8,-54.06) J5(-103.43,-54.06) J6(-64.06,-54.06) J7(-24.69,-54.06) J8(14.68,-54.06) J9(54.06,-54.06) J10(93.43,-54.06) J11(132.8,-54.06) J12(172.17,-54.06) J13(211.54,-54.06) J14(250.91,-54.06) K1(-260.91,-93.43) K2(-221.54,-93.43) K3(-182.17,-93.43) K4(-142.8,-93.43) K5(-103.43,-93.43) K6(-64.06,-93.43) K7(-24.69,-93.43) K8(14.68,-93.43) K9(54.06,-93.43) K10(93.43,-93.43) K11(132.8,-93.43) K12(172.17,-93.43) K13(211.54,-93.43) K14(250.91,-93.43) L1(-260.91,-132.8) L2(-221.54,-132.8) L3(-182.17,-132.8) L4(-142.8,-132.8) L5(-103.43,-132.8) L6(-64.06,-132.8) L7(-24.69,-132.8) L8(14.68,-132.8) L9(54.06,-132.8) L10(93.43,-132.8) L11(132.8,-132.8) L12(172.17,-132.8) L13(211.54,-132.8) L14(250.91,-132.8) M1(-260.91,-172.17) M2(-221.54,-172.17) M3(-182.17,-172.17) M4(-142.8,-172.17) M5(-103.43,-172.17) M6(-64.06,-172.17) M7(-24.69,-172.17) M8(14.68,-172.17) M9(54.06,-172.17) M10(93.43,-172.17) M11(132.8,-172.17) M12(172.17,-172.17) M13(211.54,-172.17) M14(250.91,-172.17) N1(-260.91,-211.54) N2(-221.54,-211.54) N3(-182.17,-211.54) N4(-142.8,-211.54) N5(-103.43,-211.54) N6(-64.06,-211.54) N7(-24.69,-211.54) N8(14.68,-211.54) N9(54.06,-211.54) N10(93.43,-211.54) N11(132.8,-211.54) N12(172.17,-211.54) N13(211.54,-211.54) N14(250.91,-211.54) P1(-260.91,-250.91) P2(-221.54,-250.91) P3(-182.17,-250.91) P4(-142.8,-250.91) P5(-103.43,-250.91) P6(-64.06,-250.91) P7(-24.69,-250.91) P8(14.68,-250.91) P9(54.06,-250.91) P10(93.43,-250.91) P11(132.8,-250.91) P12(172.17,-250.91) P13(211.54,-250.91) P14(250.91,-250.91)
  silkscreen extent -310,-300 300,310, body extent -301,-291 291,301, height 61
GRM21BR71A475KA73K [mm]
  rect 1.3x1.5 smd paste+0 mask+0.102: 1(-0.95,0) 2(0.95,0)
  silkscreen extent -0.15,-0.65 0.15,0.65, body extent -1,-0.62 1,0.62, height 1.45
GRM32ER60J107ME20L [mm]
  rect 1.53x2.72 smd: 1(-1.341,0) 2(1.341,0)
  silkscreen extent -0.26,-1.35 0.26,1.35, body extent -1.6,-1.25 1.6,1.25, height 2.7
GRM32ER70J476ME20L [mm]
  rect 1.53x2.72 smd: 1(-1.341,0) 2(1.341,0)
  silkscreen extent -0.26,-1.35 0.26,1.35, body extent -1.6,-1.25 1.6,1.25, height 2.7
GRM188R70J474KA01D [mm]
  rect 0.89x0.93 smd: 1(-0.77,0) 2(0.77,0)
  body extent -0.8,-0.4 0.8,0.4, height 0.9
HRO_TYPE-C-31-M-12 [mm]
  rect 0.6x1.14 smd mask+0.05: A1_B12(-3.2,4.75) A4_B9(-2.4,4.75) B1_A12(3.2,4.75) B4_A9(2.4,4.75)
  rect 0.3x1.14 smd mask+0.05: A5(-1.25,4.75) A6(-0.25,4.75) A7(0.25,4.75) A8(1.25,4.75) B5(1.75,4.75) B6(0.75,4.75) B7(-0.75,4.75) B8(-1.75,4.75)
  oval 0.9x2 hole 0.6 slot 1.7 at 90 deg: S1(-4.325,4.17) S2(4.325,4.17)
  oval 0.9x1.7 hole 0.6 slot 1.4 at 90 deg: S3(-4.325,0) S4(4.325,0)
  round 0.6 hole 0.6 unplated: ""(-2.89,3.68) ""(2.89,3.68)
  silkscreen extent -4.47,-2.6 4.47,6.1, body extent -4.47,-2.6 4.47,5.31, height 3.31
JST_B4B-PH-K-S(LF)(SN) [mm]
  rect 1.308x1.308 / inner round 1.308 / far side rect 1.308x1.308 hole 0.8: 1(3,-0.55)
  round 1.308 hole 0.8: 2(1,-0.55) 3(-1,-0.55) 4(-3,-0.55)
  silkscreen extent -4.95,-3.05 4.95,2.25, body extent -4.95,-2.25 4.95,2.25, height 6
JST_B5B-PH-K-S(LF)(SN) [mm]
  rect 1.308x1.308 / inner round 1.308 / far side rect 1.308x1.308 hole 0.8: 1(4,-0.55)
  round 1.308 hole 0.8: 2(2,-0.55) 3(0,-0.55) 4(-2,-0.55) 5(-4,-0.55)
  silkscreen extent -5.95,-3.05 5.95,2.25, body extent -5.95,-2.25 5.95,2.25, height 6
JST_B6B-PH-K-S [mm]
  rect 1.308x1.308 / inner round 1.308 / far side rect 1.308x1.308 hole 0.8: 1(5,-0.55)
  round 1.308 hole 0.8: 2(3,-0.55) 3(1,-0.55) 4(-1,-0.55) 5(-3,-0.55) 6(-5,-0.55)
  silkscreen extent -6.95,-2.25 6.95,2.25, body extent -6.95,-2.25 6.95,2.25, height 6
LED_GREEN_0805 [mm]
  rect 0.7x1.3 smd mask+0.05: 1(-0.95,0) 2(0.95,0)
  silkscreen extent -0.3,-0.6 0.3,0.6, body extent -1.01,-0.62 1.01,0.62, height 1.1
LED_RED_0805 [mm]
  rect 0.7x1.3 smd mask+0.05: 1(-0.95,0) 2(0.95,0)
  silkscreen extent -0.3,-0.6 0.3,0.6, body extent -1.01,-0.63 1.01,0.62, height 1.1
LQFP100 [mm]
  rrect50% 1.56x0.28 smd: 1(-7.68,6) 2(-7.68,5.5) 3(-7.68,5) 4(-7.68,4.5) 5(-7.68,4) 6(-7.68,3.5) 7(-7.68,3) 8(-7.68,2.5) 9(-7.68,2) 10(-7.68,1.5) 11(-7.68,1) 12(-7.68,0.5) 13(-7.68,0) 14(-7.68,-0.5) 15(-7.68,-1) 16(-7.68,-1.5) 17(-7.68,-2) 18(-7.68,-2.5) 19(-7.68,-3) 20(-7.68,-3.5) 21(-7.68,-4) 22(-7.68,-4.5) 23(-7.68,-5) 24(-7.68,-5.5) 25(-7.68,-6) 51(7.68,-6) 52(7.68,-5.5) 53(7.68,-5) 54(7.68,-4.5) 55(7.68,-4) 56(7.68,-3.5) 57(7.68,-3) 58(7.68,-2.5) 59(7.68,-2) 60(7.68,-1.5) 61(7.68,-1) 62(7.68,-0.5) 63(7.68,0) 64(7.68,0.5) 65(7.68,1) 66(7.68,1.5) 67(7.68,2) 68(7.68,2.5) 69(7.68,3) 70(7.68,3.5) 71(7.68,4) 72(7.68,4.5) 73(7.68,5) 74(7.68,5.5) 75(7.68,6)
  rrect50% 0.28x1.56 smd: 26(-6,-7.68) 27(-5.5,-7.68) 28(-5,-7.68) 29(-4.5,-7.68) 30(-4,-7.68) 31(-3.5,-7.68) 32(-3,-7.68) 33(-2.5,-7.68) 34(-2,-7.68) 35(-1.5,-7.68) 36(-1,-7.68) 37(-0.5,-7.68) 38(0,-7.68) 39(0.5,-7.68) 40(1,-7.68) 41(1.5,-7.68) 42(2,-7.68) 43(2.5,-7.68) 44(3,-7.68) 45(3.5,-7.68) 46(4,-7.68) 47(4.5,-7.68) 48(5,-7.68) 49(5.5,-7.68) 50(6,-7.68) 76(6,7.68) 77(5.5,7.68) 78(5,7.68) 79(4.5,7.68) 80(4,7.68) 81(3.5,7.68) 82(3,7.68) 83(2.5,7.68) 84(2,7.68) 85(1.5,7.68) 86(1,7.68) 87(0.5,7.68) 88(0,7.68) 89(-0.5,7.68) 90(-1,7.68) 91(-1.5,7.68) 92(-2,7.68) 93(-2.5,7.68) 94(-3,7.68) 95(-3.5,7.68) 96(-4,7.68) 97(-4.5,7.68) 98(-5,7.68) 99(-5.5,7.68) 100(-6,7.68)
  silkscreen extent -9.1,-7.1 7.1,7.1, body extent -8,-8 8,8, height 1.6
My_1X03 [mil]
  oct 60x80 hole 39.37: 1(-100,0) 2(0,0) 3(100,0)
  silkscreen extent -150,-50 150,50, body extent -149,-49 147,49, height 323
MY_TACTILE-PTH [mil]
  oct 120x60 hole 39.37: 1(-128,89) 1(128,89) 2(-128,-89) 2(128,-89)
  silkscreen extent -130,-127 130,127, body extent -152,-118 152,118, height 197
RESC1005X40X20NL05T10 [mm] "Chip Resistor, 2-Leads, Body 1.00x0.50mm, IPC Medium Density"
  rect 0.55x0.55 smd: 1(-0.45,0) 2(0.45,0)
  body extent -0.53,-0.27 0.53,0.28, height 0.4
RESC1608X55X25LL10T15 [mm] "Chip Resistor, 2-Leads, Body 1.60x0.80mm, IPC High Density"
  rect 0.6x0.8 smd: 1(-0.65,0) 2(0.65,0)
  body extent -0.85,-0.45 0.85,0.45, height 0.55
SG5032CAN [mm]
  rect 1.5x1.6 smd: 1(-1.1,1.27) 2(-1.1,-1.27) 3(1.1,-1.27) 4(1.1,1.27)
  silkscreen extent -2.5,-2.5 1.6,2.5
SMA [mm]
  rect 3.5x1.5 smd: 1(0,0) G1(0,2.7) G2(0,-2.7)
  rect 3.5x1.5 smd far side: G3(0,2.7) G4(0,-2.7)
  silkscreen extent 2.3,-0.1 2.5,0.1, body extent -11.27,-3.17 2.06,3.17, height 3.55
SOIC-8 [mil]
  rect 78x22 smd: 1(-97,75) 2(-97,25) 3(-97,-25) 4(-97,-75) 5(97,-75) 6(97,-25) 7(97,25) 8(97,75)
  silkscreen extent -54,-98 54,98, body extent -118,-96 118,96, height 69
SON4_SIT1602-7_SIT [mm]
  rect 0.9x0.8 smd paste-0.4 mask+0: 1(-0.623,-0.473) 2(0.877,-0.473) 3(0.877,0.727) 4(-0.623,0.727)
  silkscreen extent -1.85,0.65 -1.7,0.8, body extent -0.87,-0.67 1.13,0.93, height 0.8
SOT95P280X145-6N [mm]
  rrect25% 1.21x0.59 smd: 1(-1.255,0.95) 2(-1.255,0) 3(-1.255,-0.95) 4(1.255,-0.95) 5(1.255,0) 6(1.255,0.95)
  silkscreen extent -2.65,-1.57 0.81,1.57, body extent -1.4,-1.46 1.4,1.46, height 0.4
SOT-25 [mm]
  rrect15% 1.35x0.6 smd: 1(-1.185,0.95) 2(-1.185,0) 3(-1.185,-0.95) 4(1.185,-0.95) 5(1.185,0.95)
  silkscreen extent -2.57,-1.55 0.85,1.55, body extent -1.5,-1.4 1.5,1.4, height 1.4
SSOP-28 [mil]
  rect 81x17 smd: 1(-135,166) 2(-135,141) 3(-135,115) 4(-135,90) 5(-135,64) 6(-135,38) 7(-135,13) 8(-135,-13) 9(-135,-38) 10(-135,-64) 11(-135,-90) 12(-135,-115) 13(-135,-141) 14(-135,-166) 15(135,-166) 16(135,-141) 17(135,-115) 18(135,-90) 19(135,-64) 20(135,-38) 21(135,-13) 22(135,13) 23(135,38) 24(135,64) 25(135,90) 26(135,115) 27(135,141) 28(135,166)
  silkscreen extent -110,-206 110,207, body extent -154,-202 154,200, height 79
WSON-6 [mm]
  rrect5% 0.45x0.3 smd: 1(-0.975,0.65) 2(-0.975,0) 3(-0.975,-0.65) 4(0.975,-0.65) 5(0.975,0) 6(0.975,0.65)
  rect 1x1.6 smd paste-2: 7(0,0)
  round 0.3 hole 0.2 mask+0: 8(0,0.55) 9(0,-0.55)
  silkscreen extent -1.87,-1.12 1,1.12, body extent -1,-1 1,1, height 0.8

## Part data
C1 C3: library part CAP_CER_0402, "0.1 µF ±20% 16V Ceramic Capacitor X7R 0402 (1005 Metric)", Parameter 1="0.1uF 16V %20"
C2 C4: "SMD capacitor X7R(MURATA) with capacitance 10uF Tol.10%. Rated voltage 25Vdc 125C", Parameter 1="10uF 10% 25V"
C5 C6 C7 C8 C9 C10 C11 C12: "CAP CER 1UF 10V X7R 0603 / AC0603KRX7R6BB105", Parameter 1="1uF 10V"
C13 C26: library part GRM32ER70J476ME20L_1
C14 C17 C18 C21 C22 C27 C28: library part GRM21BR71A475KA73K, "GRM21BR71A475KA73K"
C15 C16 C19 C23 C24 C25 C29 C30 C31 C32: library part GRM188R70J474KA01D, "GRM188R70J474KA01D"
C20: library part GRM32ER60J107ME20L
C33 C34 C38 C39 C41 C42 C44 C45 C46 C48 C65 C66 C67: library part CAP_CER_0402, "CAP CER 0.1UF 16V X7R 0402"
  C33 C34: Parameter 1="0.1uF 16V  0402"
  C38 C41 C44 C46 C48 C65 C66 C67: Parameter 1=100nF
  C39 C42 C45: Parameter 1=0.001uF
C49 C50 C51 C52 C53 C54 C55 C56 C57 C58 C59 C60 C61 C62 C63 C64: library part CMP-1035-02072-1, "CAP 2.7nF 16V ±20% 0603 (1608 Metric) Thickness 1mm SMD", Case-EIA=0603, Case-Metric=1608, Rated Voltage="16 V", Tolerance=Â±20%, Max Thickness="1 mm", Technology=SMT
D1 D2 D3 D6 D7: library part "LED GREEN 0805", "Green 0805 130 º Min 5 mcd Typical 12 mcd Water Clear Lens SMT LED", Case Code (Metric)=2012, Case Code (Imperial)=0805, Color=Green, Forward Current=30mA, Forward Voltage=2.1V, Lens Color=Colorless, Manufacturer="Vishay Lite-On", Max Operating Temperature=85°C, Min Operating Temperature=-55°C, Package Quantity=1, Power Dissipation=100mW, Reverse Voltage=5V, Supplier Part Number 1=160-1423-1-ND, Test Current=10mA, Case/Package=0805, Category=LEDs, ComponentLink1Description=https://datasheet.ciiva.com/2110/ltst-c171gkt-2110000.pdf?src-supplier=Digi-Key, ComponentLink1URL=https://datasheet.ciiva.com/2110/ltst-c171gkt-2110000.pdf?src-supplier=Digi-Key, ComponentLink2Description=https://datasheet.ciiva.com/11773/0900766b80dc0296-11773991.pdf?src-supplier=RSComponents, ComponentLink2URL=https://datasheet.ciiva.com/11773/0900766b80dc0296-11773991.pdf?src-supplier=RSComponents, ComponentLink3Description=https://datasheet.ciiva.com/12400/lite-on-ltst-c171gkt-190133-12400647.pdf?src-supplier=Mouser, ComponentLink3URL=https://datasheet.ciiva.com/12400/lite-on-ltst-c171gkt-190133-12400647.pdf?src-supplier=Mouser, ComponentLink4Description=https://datasheet.ciiva.com/2110/ltst-c171gkt-2110001.pdf?src-supplier=Digi-Key, ComponentLink4URL=https://datasheet.ciiva.com/2110/ltst-c171gkt-2110001.pdf?src-supplier=Digi-Key, ComponentLink5Description=https://datasheet.ciiva.com/2110/ltst-c171gkt-2110002.pdf?src-supplier=Digi-Key, ComponentLink5URL=https://datasheet.ciiva.com/2110/ltst-c171gkt-2110002.pdf?src-supplier=Digi-Key, ComponentLink6Description=https://datasheet.ciiva.com/16396/ltst-c171gkt-16396549.pdf?src-supplier=Future+Electronics, ComponentLink6URL=https://datasheet.ciiva.com/16396/ltst-c171gkt-16396549.pdf?src-supplier=Future+Electronics, Depth=1.25mm, Designed by=BERK, Dominant Wavelength=569nm, Height=0.8mm, Lead Free="Lead Free", Length=2mm, Lens Style=Diffused,Colorless,Rectangular,Clear, Lens Transparency=Clear, Luminous Intensity=12mcd, Manufacturer Part Number=LTST-C171GKT, Mount="Surface Mount", Number of Elements=1, Number of LEDs=1, Number of Pins=2, Packaging="Tape and Reel", Power Rating=100mW, Pricing 1="1=0,26000, 10=0,14100, 100=0,06560, 500=0,06060, 1000=0,04747 (USD)", Radiation Hardening=No, RoHS=Yes, RoHS Compliant=Yes, Series="CHIPLED 0805", Stock 1=159023, Supplier 1=Digi-Key, Viewing Angle=130°, Wavelength=585nm, Width=1.25mm, Illumination Color=Green
D4: library part CMP-14436-000012-1, "TVS DIODE 5V 12.5V DFN1006-3"
D5: library part CMP-07163-000036-1, "DIODE ARRAY 100V 215MA SOT23-3", Capacitance=1.5pF, Case/Package=SOT-23, Current Rating=200mA, Forward Current=150mA, Forward Voltage=1.25V, Max Forward Surge Current (Ifsm)=500mA, Max Operating Temperature=150°C, Max Repetitive Reverse Voltage (Vrrm)=70V, Min Operating Temperature=-65°C, Peak Non-Repetitive Surge Current=2A, Peak Reverse Current=2.5uA, Height=0.94mm, Lead Free="Lead Free", Length=2.9mm, Mount="Surface Mount", Number of Pins=3, Packaging="Tape and Reel", REACH SVHC="No SVHC", Reverse Recovery Time=6ns, Voltage Rating (DC)=70V, Width=1.3mm
D8 D9 D10: library part "LED RED 0805", "LED Uni-Color Hyper Red 660nm 2-Pin Chip 0805(2012Metric) T/R", Case Code (Metric)=2012, Case Code (Imperial)=0805, Color=Red, Forward Current=30mA, Forward Voltage=1.8V, Lens Color=White, Manufacturer="Osram Opto", Max Operating Temperature=85°C, Min Operating Temperature=-30°C, Package Quantity=1, Reverse Voltage=5V, Supplier Part Number 1=475-1415-1-ND, Test Current=20mA, Case/Package=0805, Category=LEDs, ComponentLink1Description=http://www.jameco.com/Jameco/Products/ProdDS/2085634.pdf?src-supplier=Jameco, ComponentLink1URL=http://www.jameco.com/Jameco/Products/ProdDS/2085634.pdf?src-supplier=Jameco, ComponentLink2Description=http://components.arrow.com/part/dataview/0323_01825492?src-supplier=Arrow+Europe, ComponentLink2URL=http://components.arrow.com/part/dataview/0323_01825492?src-supplier=Arrow+Europe, ComponentLink3Description=https://dammedia.osram.info/media/resource/hires/osram-dam-2493888/LH%20R974.pdf?src-supplier=Digi-Key, ComponentLink3URL=https://dammedia.osram.info/media/resource/hires/osram-dam-2493888/LH%20R974.pdf?src-supplier=Digi-Key, ComponentLink4Description=http://www.mouser.com/ds/2/311/LH%20R974%20-%20CHIPLED%200805-318659.pdf?src-supplier=Mouser, ComponentLink4URL=http://www.mouser.com/ds/2/311/LH%20R974%20-%20CHIPLED%200805-318659.pdf?src-supplier=Mouser, ComponentLink5Description=https://www.verical.com/server-webapp/html/getDatasheet?partID=258950&src-supplier=Verical, ComponentLink5URL=https://www.verical.com/server-webapp/html/getDatasheet?partID=258950&src-supplier=Verical, ComponentLink6Description=http://components.arrow.com/part/dataview/41971690S1077610N9133?src-supplier=Arrow+Electronics, ComponentLink6URL=http://components.arrow.com/part/dataview/41971690S1077610N9133?src-supplier=Arrow+Electronics, ComponentLink7Description=http://components.arrow.com/part/dataview/41971690S6190115N2128?src-supplier=Arrow+Electronics, ComponentLink7URL=http://components.arrow.com/part/dataview/41971690S6190115N2128?src-supplier=Arrow+Electronics, Depth=1.35mm, Designed by=BERK, Dominant Wavelength=645nm, Length=2.1mm, Lens Size=1.25mm, Lens Style=Diffused,Flat,Colorless, Lens Transparency=Diffused, Luminous Flux=0.17lm, Luminous Intensity=71mcd, Manufacturer Part Number="LH R974-LP-1", Mount="Surface Mount", Number of Elements=1, Number of Pins=2, Packaging="Tape and Reel", Pricing 1="1=0,26000, 10=0,13900, 100=0,06480, 500=0,05978, 1000=0,04683, 2000=0,04584 (USD)", Radiation Hardening=No, RoHS=Yes, RoHS Compliant=Yes, Series=CHipLED, Stock 1=35632, Supplier 1=Digi-Key, Viewing Angle=160°, Width=1.25mm, Illumination Color=Red
FB1: "120 Ohms @ 100 MHz 1 Power Line Ferrite Bead 0603 (1608 Metric) 2A 50mOhm", Parameter 1="120 Ohms @ 100 MHz"
FB2: library part CMP-0686-00575-3, "Chip Ferrite Bead, 0603, 60Ω @ 100MHz, 0.1Ω, , 1A", Case Code (Metric)=1608, Case Code (Imperial)=0603, Current Rating=500mA, DC Resistance (DCR)=100mR, ESR (Equivalent Series Resistance)=60R, Frequency=100MHz, Max Operating Temperature=125°C, Min Operating Temperature=-55°C, Package Quantity=1, Tolerance=25%, Case/Package=0603, Core Material=Ferrite, Depth=0.8mm, Height=0.8mm, Lead Free="Lead Free", Length=1.6mm, Material=Steel, Max Current Rating=500mA, Max DC Current=500mA, Number of Circuits=1, Number of Lines=1, Number of Pins=2, Packaging="Tape and Reel", REACH SVHC="No SVHC", Resistance=100mR, RoHS Compliant=Yes, Shielding=Unshielded, Termination=SMD/SMT, Test Frequency=100MHz, Width=0.8mm, Impedance=60R
J1: "USB Connectors 24 Receptacle 1 8.94*7.3mm RoHS", Package=Package, Check_prices=https://www.snapeda.com/parts/TYPE-C-31-M-12/HRO+Electronics+Co.%252C+Ltd./view-part/?ref=eda, MF="HRO Electronics Co., Ltd.", MP=TYPE-C-31-M-12, SnapEDA_Link=https://www.snapeda.com/parts/TYPE-C-31-M-12/HRO+Electronics+Co.%252C+Ltd./view-part/?ref=snap
J3: "Connector Header Through Hole 6 position 0.079 (2.00mm)", Package=None, Check_prices=https://www.snapeda.com/parts/B6B-PH-K-S/JST+Sales+America+Inc./view-part/?ref=eda, MF="JST Sales", MP=B6B-PH-K-S, SnapEDA_Link=https://www.snapeda.com/parts/B6B-PH-K-S/JST+Sales+America+Inc./view-part/?ref=snap
J4: "Connector Header Through Hole 4 position 0.079 (2.00mm)", Package=None, Check_prices=https://www.snapeda.com/parts/B4B-PH-K-S%20(LF)(SN)/JST/view-part/?ref=eda, MF="JST Sales", MP="B4B-PH-K-S (LF)(SN)", SnapEDA_Link=https://www.snapeda.com/parts/B4B-PH-K-S%20(LF)(SN)/JST/view-part/?ref=snap
J5: "Conn Shrouded Header (4 Sides) HDR 5 POS 2mm Solder ST Top Entry Thru-Hole Box", Package=None, Check_prices=https://www.snapeda.com/parts/B5B-PH-K-S(LF)(SN)/JST/view-part/?ref=eda, MF="JST Sales America Inc.", MP=B5B-PH-K-S(LF)(SN), SnapEDA_Link=https://www.snapeda.com/parts/B5B-PH-K-S(LF)(SN)/JST/view-part/?ref=snap
P2: "Header, 3-Pin", ASiD Part Number="Header 3-AS"
R1 R2: library part RES_0603
R3 R4 R5 R6 R7 R8 R9 R10 R11 R12 R13 R14 R15 R16 R17 R18 R19 R20 R21 R22 R23: library part CMP-2000-06928-1, "Chip Resistor, 147 KOhm, +/- 1%, 0.1 W, -55 to 155 degC, 0603 (1608 Metric), RoHS, Tape and Reel", Manufacturer=Yageo, Operating Temperature=-55°C~155°C, Package / Case=0603(1608Metric), Package Description="2-Pin Surface Mount Device, Body 1.6 x 0.8 mm", Package Reference=0603, Power (Watts)=0.1W,1/10W, Resistance (Ohms)=147k, Standard Package=1, Temperature Coefficient=±100ppm/°C, Tolerance=±1%, Catalog Drawings=ThickFilmResistorSide, Category=Resistors, Composition=ThickFilm, Datasheet URL=http://www.yageo.com/documents/recent/PYu-RC_Group_51_RoHS_L_7.pdf, Datasheet Version="Rev. 7, 05/2017", EDA / CAD Models=DownloadfromAcceleratedDesigns, Family=ChipResistor-SurfaceMount, Features=MoistureResistant, Height="0.022\"(0.55mm)", HTML Datasheet=RCSeries,LSuffixDatasheet.html, Kits=PHH6-KIT-ND-RESKIT100K-1M1/10W5750PCS, Manufacturer URL=http://www.yageo.com/, Mounting Technology=SurfaceMount, Number of Terminations=2, Online Catalog=RC0603Series, Other Names=311-147KHRCT, Packaging=CutTape(CT), PCN Other=RC/AC0603/0805/120622/Jan/2013, Product Training Modules=ChipResistor, Series=RC, Size / Dimension="0.063\"Lx0.031\"W(1.60mmx0.80mm)", Supplier Device Package=0603
R24 R25 R26 R27 R28 R29 R30 R31 R32 R33 R34 R35: library part CMP-2002-01682-1, Manufacturer="Vishay BCcomponents", Part Number=TNPW040210K0DEED
SW1: "small tac switch", ASiD Part Number="Tac switch-AS"
U1 U4: "Linear Voltage Regulator IC Positive Fixed 1 Output 600mA SOT-25"
U2: "AP2112 Series 1.8 V 600 mA Fixed Output SMT Voltage Regulator - SOT-23-5", Case/Package=LSSOP, Dropout Voltage=500mV, Manufacturer="Diodes Inc.", Manufacturer Part Number=AP2112K-1.8TRG1, Max Junction Temperature (Tj)=85°C, Max Output current=600mA, Max Supply Voltage=6V, Min Operating Temperature=-40°C, Min Input Voltage=2.5V, Output Voltage=1.8V, Quiescent Current=80µA, Voltage Tolerance=1.5%, Accuracy=1.5%, Category="LDO Voltage Regulators", China RoHS=Compliant, ComponentLink1Description=https://datasheet.octopart.com:443/AP2112K-1.8TRG1-Diodes-Inc.-datasheet-101745658.pdf?src-supplier=IHS, ComponentLink1URL=https://datasheet.octopart.com:443/AP2112K-1.8TRG1-Diodes-Inc.-datasheet-101745658.pdf?src-supplier=IHS, ComponentLink2Description=https://datasheet.octopart.com:443/AP2112K-1.8TRG1-Diodes-Inc.-datasheet-182385097.pdf?src-supplier=IHS, ComponentLink2URL=https://datasheet.octopart.com:443/AP2112K-1.8TRG1-Diodes-Inc.-datasheet-182385097.pdf?src-supplier=IHS, ComponentLink3Description=https://datasheet.octopart.com:443/AP2112K-1.8TRG1-Diodes-Inc.-datasheet-37177583.pdf?src-supplier=SHENGYU+ELECTRONICS, ComponentLink3URL=https://datasheet.octopart.com:443/AP2112K-1.8TRG1-Diodes-Inc.-datasheet-37177583.pdf?src-supplier=SHENGYU+ELECTRONICS, Export Control Classification Number (ECCN) Code=EAR99, Harmonized Tariff Schedule (HTS) Code=8542.39.00.60, Height=1.3mm, Height - Seated (Max)=1.45mm, Length=2.92mm, Lifecycle Status=Production, Max Operating Temperature=85°C, Mounting Technology="Surface Mount", Number of Channels=1, Number of Circuits=1, Number of Outputs=1, Number of Regulators=1, Number of Terminals=5, Output Current=600mA, Output Type=Fixed, Packaging="Tape & Reel (TR)", Pins=5, Polarity=Positive, Pricing="1=0,0897, 10=0,0624, 25=0,0577 (USD)", REACH SVHC=Yes, RoHS=Compliant, Schedule B="8542390000, 8542390000|8542390000, 8542390000|8542390000|8542390000, 8542390000|8542390000|8542390000|8542390000", Stock=5067, Supplier="Arrow Electronics", Supplier Part Number=AP2112K-1.8TRG1, Terminal Pitch=950µm, Width=1.6mm
U3: "17V Clamp 5A (8/20Âµs) Ipp Tvs Diode Surface Mount SOT-23-6", Package="SOT-23-6 STMicroelectronics", Availability="In Stock", Check_prices=https://www.snapeda.com/parts/USBLC6-2SC6/STMicroelectronics/view-part/?ref=eda, MF=STMicroelectronics, MP=USBLC6-2SC6, Price=None, Purchase-URL=https://pricing.snapeda.com/search/part/USBLC6-2SC6/?ref=eda, SnapEDA_Link=https://www.snapeda.com/parts/USBLC6-2SC6/STMicroelectronics/view-part/?ref=snap
U5: "1-A, low-IQ high-accuracy low-dropout (LDO) voltage regulator with enable"
U6: library part XC7S25-1FTGB196C_1, "Description", Manufacturer_Name=AMD, Supplier Part Number=AD9226ARSZ, Copyright="Copyright (C) 2025 Ultra Librarian. All rights reserved.", Manufacturer_Part_Number=XC7S25-1FTGB196C, RefDes=RefDes, Supplier="Arrow Electronics", Type=Embedded
U7: library part CMP-00619-80966617-1, "W25Q64JVZPIQ NOR Flash Serial (SPI, Dual SPI, Quad SPI) 3V/3.3V 64M-bit 8M x 8 6ns 8-Pin WSON EP T/R/Tray/Tube", Ambient Temperature Range High=85°C, Frequency=133MHz, Max Supply Voltage=3.6V, Min Operating Temperature=-40°C, Min Supply Voltage=2.7V, Access Time=6ns, Height=800µm, Max Operating Temperature=85°C, Memory Size=8MB, Memory Type=FLASH, NexarPartId=80966617, RoHS=Non-Compliant, Schedule B="8542320070, 8542320070", Interface=SPI
U9: library part ADI-AD8XX-X8, "Single Channel Low Power Operational Amplifier, 145 MHz BW, 180 V/us SR, Industrial, 8-pin SOIC (R-8), Reel", Amplifiers Per Package=1, Generic Part Number=AD8065, Manufacturer="Analog Devices", Input Bias Current=2pA, Input Offset Voltage=400uV, Automotive Qualified=Yes, Code_JEDEC=MS-012-AA, ComponentLink1Description="Manufacturer URL", ComponentLink1URL=http://www.analog.com/en/index.html, ComponentLink2Description=Datasheet, ComponentLink2URL=http://www.analog.com/static/imported-files/data_sheets/AD8065_8066.pdf, ComponentLink3Description="Package Specification", ComponentLink3URL=http://www.analog.com/static/imported-files/packages/PKG_PDF/SOIC_Narrow%20(R)/R_8.pdf, ComponentLink4Description="Reference Circuit", ComponentLink4URL=http://www.analog.com/en/all-operational-amplifiers-op-amps/operational-amplifiers-op-amps/ad8065/products/product.html#product-recommendations, DatasheetVersion="Rev. J", Mounting Technology="Surface Mount", PackageDescription="8-Pin Standard Small Outline Package, Body 3.9 x 4.9 mm, Pitch 1.27 mm", PackageReference=R-8, PackageVersion=060506-A, PartNumber=AD8065ARZ-REEL7, RevisionNote="Reference Circuit URL fixed", Slew Rate=180V/us, Small Signal Bandwidth=145MHz, V Span Max=24V, V Span Min=5V, Iq/Amp=7.4mA
U11: "12-Bit, 65 MSPS Analog-to-Digital Converter"
Y1: "SG5032CAN"
Y2: "Oscillator MEMS 65MHz ±25ppm (Stability) 15pF HCMOS/LVCMOS 55% 2.5V/3.3V 4-Pin QFN SMD T/R", Frequency=65MHz, Frequency Stability=25ppm, Load Capacitance=15pF, Manufacturer=SiTime, Max Operating Temperature=70°C, Max Supply Voltage=3.63V, Min Operating Temperature=-20°C, Min Supply Voltage=2.25V, Category=Crystals, ComponentLink1Description=https://datasheet.octopart.com:443/SIT1602BC-72-XXN-65.000000G-SiTime-datasheet-168041894.pdf?src-supplier=IHS, ComponentLink1URL=https://datasheet.octopart.com:443/SIT1602BC-72-XXN-65.000000G-SiTime-datasheet-168041894.pdf?src-supplier=IHS, ComponentLink2Description=https://datasheet.octopart.com:443/SIT1602BC-72-XXN-65.000000G-SiTime-datasheet-180805158.pdf?src-supplier=IHS, ComponentLink2URL=https://datasheet.octopart.com:443/SIT1602BC-72-XXN-65.000000G-SiTime-datasheet-180805158.pdf?src-supplier=IHS, Country of Origin="Malaysia, Taiwan, Thailand", Fall Time=2ns, Lifecycle Status=Production, Manufacturer Part Number=SIT1602BC-72-XXN-65.000000G, Mounting Technology="Surface Mount", Number of Terminals=4, Output Type=LVCMOS, Pricing="250=0,94997, 500=0,93011, 1000=0,91025, 2000=0,89039, 4000=0,87053 (USD)", REACH SVHC=Yes, Rise Time=2ns, RoHS=Compliant, Supplier=Avnet, Supplier Part Number=SIT1602BC-72-XXN-65.000000G, Introduction Date=2017-05-31
Y3: library part CMP-27762-009874-1, "CRYSTAL 8.0000MHZ 18PF SMD", Case/Package=SMD/SMT, ESR (Equivalent Series Resistance)=80R, Frequency=8MHz, Frequency Stability=50ppm, Frequency Tolerance=20ppm, Load Capacitance=18pF, Max Operating Temperature=70°C, Min Operating Temperature=-20°C, Operating Frequency="8 MHz", Package Quantity=1000, Accuracy=20ppm, Contact Plating=Tin, Depth=4.7mm, Height=0.165inch, Lead Free="Lead Free", Length=11.4mm, Mount="Surface Mount", Number of Pins=2, Packaging="Tape and Reel", Radiation Hardening=No, REACH SVHC="No SVHC", Series=ABLS, Series Resistance=80R, Termination=SMD/SMT, Tolerance=20ppm, Width=4.7mm
C35 C37 C40 C43 C47: Parameter 1=10uF
C36: Parameter 1=100nF

## Free pads (board coordinates)
  round 0 hole 3 unplated mask-2539.97: 1(3.048,3.048) 1(3.107,55.021) 1(86.507,2.996) 1(86.507,55.021)

## Via types
v1: diameter 0.45, hole 0.2, L1 to L6, 77 vias
v2: diameter 0.483, hole 0.114, L1 to L6, 57 vias

## Nets (pads, with @x,y where several pads share a name; then routed paths per layer and width w, separated by ;. In a path a pad name is that pad's centre, name@x,y a point inside that pad or via, vN(x,y) a via of type N, cw(c..) or ccw(c..) an arc to the next point about the centre after c; other vN are vias at no path point)
+1V0: C6.2 C17.2 C18.2 C19.2 C20.2 C21.2 C22.2 C23.2 C24.2 C25.2 R35.2 U2.3 U5.1 U6.D6 U6.D8 U6.E5 U6.E7 U6.E9 U6.F6 U6.G5 U6.G9 U6.H6 U6.J5 U6.J9 U6.K6 U6.K8 | length 39.3
  L1 w0.3: U2.3@41.735,12.221 41.738,12.224 43.782,12.224 ; v1(43.782,12.846) 43.782,12.224 ; U5.1@47.407,12.221 46.602,12.221 ; R35.2@50.507,7.346 50.507,8.446 50.207,8.746 47.732,8.746 46.602,9.876 46.602,12.221 ; 43.782,12.224 45.505,12.224 C6.2@45.507,12.226 45.512,12.221 46.602,12.221
  L1 w0.483: v2(39.432,24.246) U6.J5@39.857,24.671 ; v1(39.432,26.246) U6.G5@39.857,26.671 ; U6.E5@39.857,28.671 v2(40.282,29.096) ; v2(40.432,23.246) U6.K6@40.857,23.671 ; v2(40.432,30.096) U6.D6@40.857,29.671 ; U6.E7@41.857,28.671 v2(42.282,29.096) ; v2(42.432,23.246) U6.K8@42.857,23.671 ; v2(43.432,26.246) U6.G9@43.857,26.671 ; U6.J9@43.857,24.671 v2(44.282,25.096) ; U6.E9@43.857,28.671 v2(44.282,29.096)
  L6 w0.483: C22.2@39.12,21.721 39.12,21.821 40.432,23.133 v2(40.432,23.246) ; v2(39.432,24.246) 39.432,25.129 C23.2@39.532,25.229 ; C20.2@39.566,35.546 39.957,35.155 39.957,33.753 40.432,33.278 v2(40.432,30.096) ; v2(40.282,29.096) 41.127,29.096 C19.2@41.157,29.066 ; C21.2@41.942,21.821 41.91,21.853 41.91,22.86 42.296,23.246 v2(42.432,23.246) ; v2(42.282,29.096) 42.282,30.108 C18.2@42.596,30.422 ; C25.2@42.352,25.746 42.352,25.866 42.506,26.02 42.626,26.02 42.852,26.246 v2(43.432,26.246) ; v2(44.282,25.096) 46.807,25.096 C17.2@47.028,25.317 ; v2(44.282,29.096) 44.739,29.096 45.734,30.091 C24.2@45.734,30.111
+1V8: C7.2 C13.2 C14.2 C15.2 C16.2 R34.2 U1.3 U2.5 U6.F8 U6.F10 U6.H10 U6.K10 U6.L9 | length 63.6
  L1 w0.483: R34.2@39.007,7.265 39.018,7.276 39.018,9.046 ; U2.5@39.029,10.321 39.018,10.31 39.018,9.046 ; v1(40.782,15.046) 40.782,14.046 40.882,13.946 ; U6.F8@42.857,27.671 v2(43.282,28.096) ; U6.K10@44.857,23.671 v2(45.282,23.246) ; U6.H10@44.857,25.671 v2(45.282,26.096) ; U6.F10@44.857,27.671 v2(45.282,28.096) ; U1.3@68.192,11.921 68.133,11.862 67.434,11.862 66.992,11.42 66.992,9.256 66.532,8.796 62.632,8.796 62.007,8.171 62.007,6.921 61.357,6.271 55.782,6.271 54.657,7.396 54.657,12.171 52.882,13.946 37.507,13.946 36.557,12.996 36.557,11.901 37.252,11.901 37.657,11.496 37.657,9.446 38.057,9.046 39.018,9.046
  L6 w0.483: C16.2@42.662,27.196 42.662,27.216 43.282,27.836 v2(43.282,28.096) ; v2(45.282,23.246) 45.466,23.062 45.466,21.012 C14.2@45.741,20.737 ; v2(45.282,28.096) 46.037,28.096 C15.2@46.182,28.241
  L6 w1: v1(40.782,15.046) 41.882,16.146 C13.2@44.241,16.146